# Altium PCB FMM-v1.0.PcbDoc (part 2 of 5)
Units mm, origin at the board's own origin, x right, y up, seen from the top; angles counter-clockwise.
Board outline 115 x 96 mm, 4 copper layers (Top Layer, Power Layer, Ground Layer, Bottom Layer), stack 1.57 mm thick; 218 components, 129 nets, 744 pads, 321 vias.
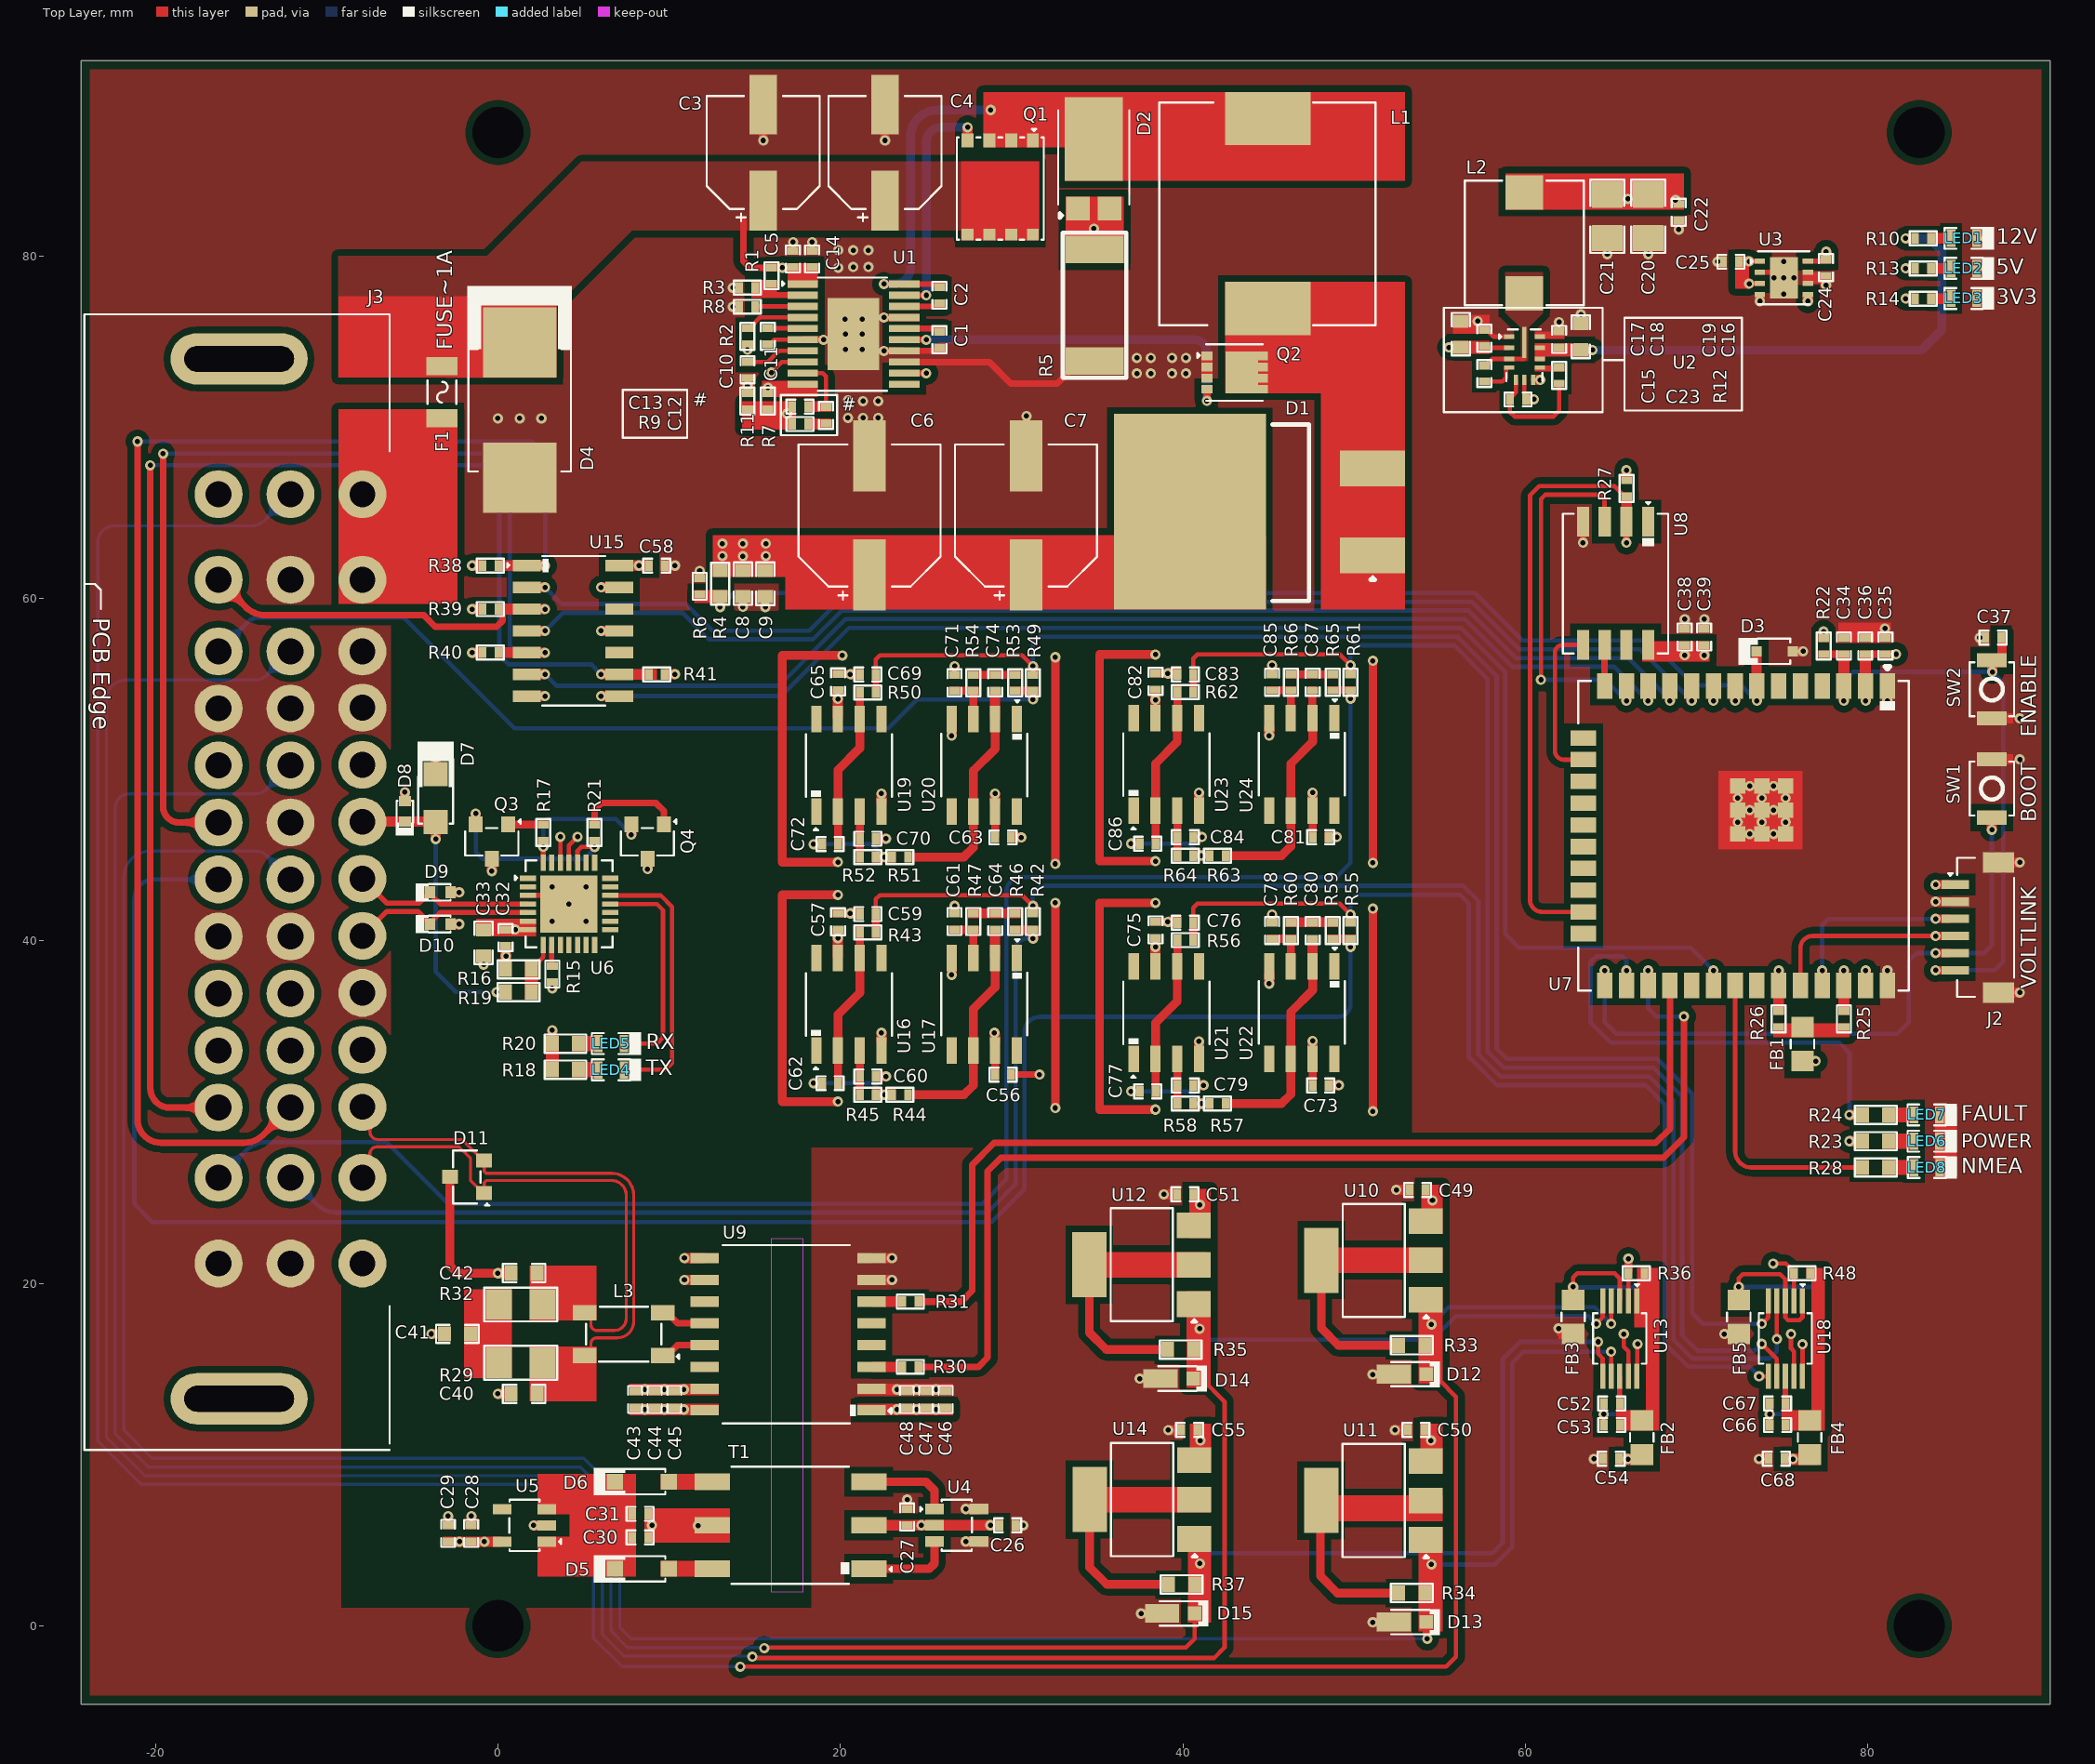
[diagram p0: Top Layer view]

## Part data (continued)
D1: "DIODE SCHOTTKY 100V 20A D2PAK", LCSC Part Number=C969989, Manufacturer=STMicroelectronics, Supplier Part Number=511-STPS20M100SG-TR, Category="Rectifier Diodes", ComponentLink1Description=https://datasheet.ciiva.com/16356/cd00228904-16356744.pdf?src-supplier=Future+Electronics, ComponentLink1URL=https://datasheet.ciiva.com/16356/cd00228904-16356744.pdf?src-supplier=Future+Electronics, ComponentLink2Description=https://datasheet.ciiva.com/917/cd00228904-917526.pdf?src-supplier=Digikey, ComponentLink2URL=https://datasheet.ciiva.com/917/cd00228904-917526.pdf?src-supplier=Digikey, ComponentLink3Description=https://datasheet.ciiva.com/917/cd00228904-917527.pdf?src-supplier=Digikey, ComponentLink3URL=https://datasheet.ciiva.com/917/cd00228904-917527.pdf?src-supplier=Digikey, Item Type=Diode, Manufacturer Part Number=STPS20M100SG-TR, Pricing="1=2.95, 10=2.48, 50=2.48, 100=2.01, 1000=1.53, 10000=1.38 (USD)", RoHS=Yes, Stock=6295, Supplier=Mouser
D2: "DIODE SCHOTTKY 60V 7A POWERDI5", LCSC Part Number=C96113, Manufacturer=Diodes, Reverse Voltage=60V, Supplier Part Number=7738990, Category="Rectifier Diodes", ComponentLink1Description=https://datasheet.ciiva.com/4715/ds30477-62081-4715698.pdf?src-supplier=Mouser, ComponentLink1URL=https://datasheet.ciiva.com/4715/ds30477-62081-4715698.pdf?src-supplier=Mouser, ComponentLink2Description=https://datasheet.ciiva.com/915/ds30477-915170.pdf?src-supplier=Digikey, ComponentLink2URL=https://datasheet.ciiva.com/915/ds30477-915170.pdf?src-supplier=Digikey, ComponentLink3Description=https://datasheet.ciiva.com/16475/ds30477-16475660.pdf?src-supplier=Future+Electronics, ComponentLink3URL=https://datasheet.ciiva.com/16475/ds30477-16475660.pdf?src-supplier=Future+Electronics, ComponentLink4Description=https://datasheet.ciiva.com/7964/ds30477-7964294.pdf?src-supplier=Element14, ComponentLink4URL=https://datasheet.ciiva.com/7964/ds30477-7964294.pdf?src-supplier=Element14, ComponentLink5Description=https://datasheet.ciiva.com/8301/ds30477-8301047.pdf?src-supplier=Avnet, ComponentLink5URL=https://datasheet.ciiva.com/8301/ds30477-8301047.pdf?src-supplier=Avnet, ComponentLink6Description=https://datasheet.ciiva.com/8301/ds30477-8301849.pdf?src-supplier=Avnet, ComponentLink6URL=https://datasheet.ciiva.com/8301/ds30477-8301849.pdf?src-supplier=Avnet, ComponentLink7Description=https://datasheet.ciiva.com/915/ds30477-915171.pdf?src-supplier=Digikey, ComponentLink7URL=https://datasheet.ciiva.com/915/ds30477-915171.pdf?src-supplier=Digikey, ComponentLink8Description=https://datasheet.ciiva.com/915/ds30477-915172.pdf?src-supplier=Digikey, ComponentLink8URL=https://datasheet.ciiva.com/915/ds30477-915172.pdf?src-supplier=Digikey, Item Type=Diode, Manufacturer Part Number=PDS760-13, Pricing="5000=0.31, 10000=0.305, 15000=0.3, 20000=0.3 (USD)", RoHS=No, Stock=295000, Supplier="Future Electronics"
D3: "DIODE ZENER 3.3V 200MW SOD323F", Forward Voltage=1V, LCSC Part Number=C2978865, Manufacturer="ON Semiconductor / Fairchild", Max Operating Temperature=150°C, Max Power Dissipation=200mW, Max Reverse Leakage Current=4.5uA, Min Operating Temperature=-65°C, Package Quantity=1, Supplier Part Number 1=MM3Z3V3BCT-ND, Test Current=5mA, Tolerance=2%, Working Voltage=3.3V, ComponentLink1Description=http://www.onsemi.com/pub/Collateral/MM3Z9V1B-D.pdf?src-supplier=Digi-Key, ComponentLink1URL=http://www.onsemi.com/pub/Collateral/MM3Z9V1B-D.pdf?src-supplier=Digi-Key, ComponentLink2Description=http://www.mouser.com/ds/2/149/MM3Z3V3B-187166.pdf?src-supplier=Mouser, ComponentLink2URL=http://www.mouser.com/ds/2/149/MM3Z3V3B-187166.pdf?src-supplier=Mouser, ComponentLink3Description=https://www.fairchildsemi.com/datasheets/MM/MM3Z9V1B.pdf?src-supplier=Avnet, ComponentLink3URL=https://www.fairchildsemi.com/datasheets/MM/MM3Z9V1B.pdf?src-supplier=Avnet, ComponentLink4Description=http://www.farnell.com/datasheets/1706525.pdf?src-supplier=Element14, ComponentLink4URL=http://www.farnell.com/datasheets/1706525.pdf?src-supplier=Element14, Element Configuration=Single, Height=1mm, Impedance=89R, Lead Free="Lead Free", Length=1.3mm, Manufacturer Part Number=MM3Z3V3B, Mount="Surface Mount", Number of Pins=2, Packaging="Tape and Reel", Peak Reverse Current=4.5uA, Power Dissipation=200mW, Pricing 1="1=0.22, 10=0.18, 100=0.0956, 500=0.06288, 1000=0.04276 (USD)", Radiation Hardening=No, REACH SVHC="No SVHC", Stock 1=473644, Supplier 1=Digi-Key, Voltage Tolerance=2%, Weight=0.0276g, Width=1.7mm, Zener Voltage=3.3V
D4: "TVS DIODE 30VWM 48.4VC SMC", Case/Package=SMC, Manufacturer=Diodes, Max Operating Temperature=175°C, Min Breakdown Voltage=33.3V, Min Operating Temperature=-55°C, Peak Pulse Current=62A, Peak Pulse Power=3kW, Power Line Protection=Yes, Reverse Standoff Voltage=30V, Supplier Part Number=3.0SMCJ30AQ-13-ND, Category="TVS Diodes", ComponentLink1Description=https://www.diodes.com/assets/product-showcases/Automotive-Grade-SMAJ-SMBJ-SMCJ-3.0SMCJ-TVS-Diodes-NPA-112018.pdf?src-supplier=Digikey, ComponentLink1URL=https://www.diodes.com/assets/product-showcases/Automotive-Grade-SMAJ-SMBJ-SMCJ-3.0SMCJ-TVS-Diodes-NPA-112018.pdf?src-supplier=Digikey, Diode Type=ZENER, Item Type=Diode, Manufacturer Part Number=3.0SMCJ30AQ-13, Mounting Technology="Surface Mount", Number of Unidirectional Channels=1, Packaging="Tape and Reel", Pricing="3000=0.66437, 6000=0.63274, 9000=0.60353 (USD)", RoHS=Yes, RoHS Compliant=Yes, Series="Automotive, AEC-Q101", Supplier=Digikey
D5 D6: "DIODE SCHOTTKY 20V 500MA SOD123", Average Rectified Current=500mA, Case/Package=SOD-123-2, Forward Voltage=385mV, LCSC Part Number=C23848, Manufacturer="ON Semiconductor", Max Forward Surge Current (Ifsm)=5.5A, Max Operating Temperature=125°C, Max Repetitive Reverse Voltage (Vrrm)=20V, Max Reverse Current=250uA, Min Operating Temperature=-65°C, Package Quantity=1, Supplier Part Number=MBR0520LT1GOSDKR-ND, Category="Schottky Diodes", ComponentLink1Description=https://datasheet.ciiva.com/915/mbr0520lt1-d-915488.pdf?src-supplier=Avnet, ComponentLink1URL=https://datasheet.ciiva.com/915/mbr0520lt1-d-915488.pdf?src-supplier=Avnet, ComponentLink2Description=https://datasheet.ciiva.com/915/mbr0520lt1-d-915488.pdf?src-supplier=Digikey, ComponentLink2URL=https://datasheet.ciiva.com/915/mbr0520lt1-d-915488.pdf?src-supplier=Digikey, ComponentLink3Description=https://datasheet.ciiva.com/14168/sy600925-e-14168052.pdf?src-supplier=Distrelec, ComponentLink3URL=https://datasheet.ciiva.com/14168/sy600925-e-14168052.pdf?src-supplier=Distrelec, ComponentLink4Description=https://datasheet.ciiva.com/5762/mbr0520lt1-d-5762891.pdf?src-supplier=Farnell, ComponentLink4URL=https://datasheet.ciiva.com/5762/mbr0520lt1-d-5762891.pdf?src-supplier=Farnell, ComponentLink5Description=https://datasheet.ciiva.com/7962/mbr0520lt1-d-7962698.pdf?src-supplier=Element14, ComponentLink5URL=https://datasheet.ciiva.com/7962/mbr0520lt1-d-7962698.pdf?src-supplier=Element14, ComponentLink6Description=https://datasheet.ciiva.com/5762/mbr0520lt1-d-5762889.pdf?src-supplier=Farnell, ComponentLink6URL=https://datasheet.ciiva.com/5762/mbr0520lt1-d-5762889.pdf?src-supplier=Farnell, ComponentLink7Description=https://datasheet.ciiva.com/14559/70099495-14559898.pdf?src-supplier=Allied+Electronics, ComponentLink7URL=https://datasheet.ciiva.com/14559/70099495-14559898.pdf?src-supplier=Allied+Electronics, ComponentLink8Description=https://datasheet.ciiva.com/4714/mbr0520lt1-d-94265-4714156.pdf?src-supplier=Mouser, ComponentLink8URL=https://datasheet.ciiva.com/4714/mbr0520lt1-d-94265-4714156.pdf?src-supplier=Mouser, ComponentLink9Description=https://datasheet.ciiva.com/7961/mbr0520lt1-d-7961765.pdf?src-supplier=Element14, ComponentLink9URL=https://datasheet.ciiva.com/7961/mbr0520lt1-d-7961765.pdf?src-supplier=Element14, ComponentLink10Description=https://datasheet.ciiva.com/7962/mbr0520lt1-d-7962699.pdf?src-supplier=Element14, ComponentLink10URL=https://datasheet.ciiva.com/7962/mbr0520lt1-d-7962699.pdf?src-supplier=Element14, ComponentLink11Description=https://datasheet.ciiva.com/16395/mbr0520lt1-d-16395977.pdf?src-supplier=Future+Electronics, ComponentLink11URL=https://datasheet.ciiva.com/16395/mbr0520lt1-d-16395977.pdf?src-supplier=Future+Electronics, ComponentLink12Description=https://datasheet.ciiva.com/915/mbr0520lt1-d-915489.pdf?src-supplier=Digikey, ComponentLink12URL=https://datasheet.ciiva.com/915/mbr0520lt1-d-915489.pdf?src-supplier=Digikey, ComponentLink13Description=https://datasheet.ciiva.com/915/mbr0520lt1-d-915490.pdf?src-supplier=Digikey, ComponentLink13URL=https://datasheet.ciiva.com/915/mbr0520lt1-d-915490.pdf?src-supplier=Digikey, Current Rating=500mA, Element Configuration=Single, Forward Current=500mA, Height=1.12mm, Item Type=Diode, Lead Free="Lead Free", Length=2.69mm, Manufacturer Part Number=MBR0520LT1G, Max Reverse Leakage Current=250uA, Max Reverse Voltage (DC)=20V, Max Surge Current=5.5A, Output Current=500mA, Packaging="Tape and Reel", Peak Non-Repetitive Surge Current=5.5A, Pins=2, Polarity=Standard, Pricing="1=0.36, 10=0.255, 100=0.129, 500=0.1052, 1000=0.07805 (USD)", Radiation Hardening=No, Reach SVHC Compliant=No, RoHS=Yes, RoHS Compliant=Yes, Series=-, Supplier=Digikey, Termination=SMD/SMT, Voltage Rating (DC)=20V, Width=1.6mm
D7: "DIODE SCHOTTKY 30V 1A SOD123W", LCSC Part Number=C456106, Manufacturer=Nexperia, Supplier Part Number 1=1727-5201-1-ND, Manufacturer Part Number=PMEG3010ER,115, Pricing 1="1=0.35, 10=0.282, 25=0.258, 100=0.162, 250=0.1602, 500=0.15, 1000=0.102 (USD)", Stock 1=72983, Supplier 1=Digi-Key
D8 D9 D10: "SOD-523 ESD Protection Devices ROHS", LCSC Part Number=C5199850, Manufacturer=UMW, Package=SOD-523, ComponentLink1Description=LCSC, ComponentLink1URL=https://www.lcsc.com/product-detail/span-style-background-color-ff0-ESD-span-Protection-Devices_UMW-Youtai-Semiconductor-Co-Ltd-LESD5D5-0CT1G_C5199850.html, Item Type="Protection Device", Manufacturer Part Number=LESD5D5.0CT1G
D11: "TVS DIODE 7V/12V 14V/26V SOT23-3", Breakdown Voltage=13.3V, Case/Package=SOT-23, Clamping Voltage=19V, LCSC Part Number=C404012, Leakage Current=20uA, Manufacturer=Bourns, Max Operating Temperature=150°C, Max Power Dissipation=600W, Max Surge Current=30A, Min Breakdown Voltage=7.5V, Min Operating Temperature=-55°C, Peak Pulse Current=17A, Peak Pulse Power=400W, Power Line Protection=No, Reverse Standoff Voltage=12V, Supplier Part Number=7673728P, Test Current=1mA, Category="TVS Diodes", ComponentLink1Description=https://datasheet.ciiva.com/1281/1670933-1281331.pdf?src-supplier=Farnell, ComponentLink1URL=https://datasheet.ciiva.com/1281/1670933-1281331.pdf?src-supplier=Farnell, ComponentLink2Description=https://datasheet.ciiva.com/4510/cdsot23-sm712-25932-4510261.pdf?src-supplier=Mouser, ComponentLink2URL=https://datasheet.ciiva.com/4510/cdsot23-sm712-25932-4510261.pdf?src-supplier=Mouser, ComponentLink3Description=https://datasheet.ciiva.com/11193/cdsot23-sm712-11193846.pdf?src-supplier=Avnet, ComponentLink3URL=https://datasheet.ciiva.com/11193/cdsot23-sm712-11193846.pdf?src-supplier=Avnet, ComponentLink4Description=https://datasheet.ciiva.com/22696/1670933-22696779.pdf?src-supplier=Element14, ComponentLink4URL=https://datasheet.ciiva.com/22696/1670933-22696779.pdf?src-supplier=Element14, ComponentLink5Description=https://datasheet.ciiva.com/26828/getdatasheetpartid-418501-26828522.pdf?src-supplier=Verical, ComponentLink5URL=https://datasheet.ciiva.com/26828/getdatasheetpartid-418501-26828522.pdf?src-supplier=Verical, ComponentLink6Description=https://datasheet.ciiva.com/337/cdsot23-sm712-337451.pdf?src-supplier=Digikey, ComponentLink6URL=https://datasheet.ciiva.com/337/cdsot23-sm712-337451.pdf?src-supplier=Digikey, ComponentLink7Description=https://datasheet.ciiva.com/337/cdsot23-sm712-337452.pdf?src-supplier=Digikey, ComponentLink7URL=https://datasheet.ciiva.com/337/cdsot23-sm712-337452.pdf?src-supplier=Digikey, Contact Plating=Tin, Depth=1.4mm, Diode Type=ZENER, Direction=Bidirectional, ESD Protection=Yes, Height=1.11mm, Item Type="Surge Protection (TVS/ESD)", Length=3.04mm, Manufacturer Part Number=CDSOT23-SM712, Max Breakdown Voltage=13.3V, Max Reverse Leakage Current=20uA, Mounting Technology="Surface Mount", Number of Bidirectional Channels=2, Number of Channels=2, Number of Elements=2, Packaging="Tape and Reel", Pins=3, Polarity=Bidirectional,Unidirectional, Power Dissipation=400W, Pricing="100=0.935, 1500=0.651, 3000=0.565, 6000=0.553 (GBP)", Radiation Hardening=No, Reach SVHC Compliant=No, Reverse Breakdown Voltage=13.3V, RoHS=Yes, RoHS Compliant=Yes, Series=-, Stock=89660, Supplier=Rs, Termination=SMD/SMT, Width=0.055inch, Working Voltage=12V
D12 D13 D14 D15: "TVS DIODE 3.3VWM 11.5VC MICROSMP", Breakdown Voltage=4.1V, Clamping Voltage=11V, LCSC Part Number=C241899, Max Operating Temperature=150°C, Max Reverse Leakage Current=200uA, Max Surge Current=75A, Min Operating Temperature=-55°C, Operating Supply Voltage=3.3V, Package Quantity=4500, Peak Pulse Current=87A, Peak Pulse Power=150W, Power Line Protection=No, Supplier Part Number=625-MSP3V3HM3, Test Current=1mA, Category="TVS Diodes", ComponentLink1Description=LCSC, ComponentLink2Description=https://datasheet.ciiva.com/14080/msp3v3-14080471.pdf?src-supplier=Digi-Key, ComponentLink2URL=https://datasheet.ciiva.com/14080/msp3v3-14080471.pdf?src-supplier=Digi-Key, Diode Type=ZENER, Direction=Unidirectional, Item Type="TVS Diode", Min Breakdown Voltage=4.1V, Mounting Technology="Surface Mount", Number of Unidirectional Channels=1, Packaging="Tape and Reel", Polarity=Unidirectional, Pricing="1=0.39, 10=0.313, 50=0.313, 100=0.165, 1000=0.068, 10000=0.05 (USD)", Reverse Standoff Voltage=3.3V, RoHS=Yes, RoHS Compliant=Yes, Series="Automotive, AEC-Q101, TransZorb®, eSMP™", Stock=15021, Supplier=Mouser
F1: "16V 1A 100A 1.8A 1206 Resettable Fuses ROHS", LCSC Part Number=C883131, Manufacturer=BHFUSE, Manufacturer Part Number=BSMD1206-100-16V, RoHS=No, Supplier=LCSC
FB1 FB2 FB3 FB4 FB5: "FERRITE BEAD 1K OHM 0805 1LN", Case Code (Imperial)=0805, Case Code (Metric)=2012, DC Resistance (DCR)=300mR, LCSC Part Number=C307765, Manufacturer=TDK, Max Current Rating=500mA, Max Operating Temperature=125°C, Min Operating Temperature=-55°C, Package Quantity=4000, Ratings=AEC-Q200, Supplier Part Number 1=445-MMZ2012R102ATD25CT-ND, Test Frequency=100MHz, Tolerance=25%, Case/Package=0805, Category="Ferrite Beads and Chips", ComponentLink1Description=http://www.mouser.com/ds/2/400/beads_automotive_signal_mmz_en-469244.pdf?src-supplier=Mouser, ComponentLink1URL=http://www.mouser.com/ds/2/400/beads_automotive_signal_mmz_en-469244.pdf?src-supplier=Mouser, ComponentLink2Description=https://product.tdk.com/info/en/catalog/datasheets/beads_automotive_signal_mmz2012_en.pdf?src-supplier=Digi-Key, ComponentLink2URL=https://product.tdk.com/info/en/catalog/datasheets/beads_automotive_signal_mmz2012_en.pdf?src-supplier=Digi-Key, Height=0.041inch, Impedance=1kR, Item Type="Ferrite Bead", Length=0.079inch, Manufacturer Part Number=MMZ2012R102ATD25, Max DC Current=500mA, Mount="Surface Mount", Number of Lines=1, Packaging="Tape and Reel", Pricing 1="1=0.11000, 10=0.09200, 25=0.08280, 50=0.06080, 100=0.05240, 250=0.04140, 500=0.03496, 1000=0.02944 (USD)", RoHS=Yes, RoHS Compliant=Yes, Stock 1=2942, Supplier 1=Digi-Key, Termination=SMD/SMT, Weight=0.000194oz, Width=0.049inch
J2: library part C145963, "1x6P SH 1 1mm 6 SMD,P=1mm Wire To Board / Wire To Wire Connector ROHS", Manufacturer=BOOMELE, Package=SMD,P=1mm, ComponentLink1Description=LCSC, ComponentLink1URL=https://www.lcsc.com/product-detail/Wire-To-Board-Wire-To-Wire-Connector_BOOMELE-Boom-Precision-Elec-C145963_C145963.html, Item Type=Connector, LCSC Part Number=C145963, Manufacturer Part Number=C145963
L1: library part SRP1265A-8R2M, "FIXED IND 8.2UH 10.5A 15.5 MOHM", Case/Package=Nonstandard, Current Rating=10.5A, DC Resistance (DCR)=15.5mR, Inductance Tolerance=20%, LCSC Part Number=C2042528, Manufacturer=Bourns, Max Operating Temperature=150°C, Min Operating Temperature=-40°C, Ratings=AEC-Q200, Saturation Current=16A, Self Resonant Frequency=11MHz, Supplier Part Number=64X8728, Test Frequency=100kHz, Category="Fixed Inductors", ComponentLink1Description=https://datasheet.ciiva.com/48685/srp1265a-48685302.pdf?src-supplier=Avnet, ComponentLink1URL=https://datasheet.ciiva.com/48685/srp1265a-48685302.pdf?src-supplier=Avnet, Core Material="Carbonyl Powder", Depth=12.5mm, Height=6.2mm, Height - Seated (Max)=0.252inch, Item Type=Inductor, Length=0.531inch, Manufacturer Part Number=SRP1265A-8R2M, Max DC Current=10.5A, Mounting Technology="Surface Mount", Packaging="Cut Tape", Pricing="1=0.97 (USD)", Radiation Hardening=No, Reach SVHC Compliant=No, RMS Current (Irms)=10.5A, RoHS=Yes, RoHS Compliant=Yes, Series=SRP1265A, Shielding=Shielded, Stock=27, Supplier=Avnet, Termination=SMD/SMT, Tolerance=20%, Width=0.492inch
L2: library part CLF7045T-2R2N-D, "FIXED IND 2.2UH 4.3A 18.98 MOHM", LCSC Part Number=C474321, Manufacturer=TDK, Category="Fixed Inductors", ComponentLink1Description=https://datasheet.ciiva.com/30489/0900766b8129d3e9-30489231.pdf?src-supplier=Rs, ComponentLink1URL=https://datasheet.ciiva.com/30489/0900766b8129d3e9-30489231.pdf?src-supplier=Rs, ComponentLink2Description=https://datasheet.ciiva.com/15026/e531-clf-d-15026965.pdf?src-supplier=Digikey, ComponentLink2URL=https://datasheet.ciiva.com/15026/e531-clf-d-15026965.pdf?src-supplier=Digikey, ComponentLink3Description=https://datasheet.ciiva.com/15026/e531-clf-d-15026966.pdf?src-supplier=Digikey, ComponentLink3URL=https://datasheet.ciiva.com/15026/e531-clf-d-15026966.pdf?src-supplier=Digikey, ComponentLink4Description=https://datasheet.ciiva.com/15026/e531-clf-d-15026967.pdf?src-supplier=Digikey, ComponentLink4URL=https://datasheet.ciiva.com/15026/e531-clf-d-15026967.pdf?src-supplier=Digikey, Item Type=Inductor, Manufacturer Part Number=CLF7045T-2R2N-D, Pricing="1=0.5089, 10=0.502, 25=0.4797, 100=0.467, 250=0.4651, 500=0.4631, 1000=0.4612 (USD)", RoHS=Yes, Stock=1021, Supplier="Arrow Electronics", Supplier Part Number=CLF7045T-2R2N-D
L3: "CMC 51UH 200MA 2LN 2.8KOHM SMD", Case Code (Imperial)=1812, Current Rating=200mA, DC Resistance (DCR)=1R, Insulation Resistance=10MR, LCSC Part Number=C76584, Manufacturer=TDK, Max Operating Temperature=150°C, Min Operating Temperature=-40°C, Package Quantity=2000, Ratings=AEC-Q200, Test Frequency=10MHz, Tolerance=50%, Voltage Rating=50V, Case/Package=1812, Category="Fixed Inductors", ComponentLink1Description=https://datasheet.ciiva.com/22726/1649098-22726290.pdf?src-supplier=Element14, ComponentLink1URL=https://datasheet.ciiva.com/22726/1649098-22726290.pdf?src-supplier=Element14, ComponentLink2Description=https://datasheet.ciiva.com/1007/e9711-act-1007931.pdf?src-supplier=Digikey, ComponentLink2URL=https://datasheet.ciiva.com/1007/e9711-act-1007931.pdf?src-supplier=Digikey, ComponentLink3Description=https://datasheet.ciiva.com/1007/e9711-act-1007933.pdf?src-supplier=Digikey, ComponentLink3URL=https://datasheet.ciiva.com/1007/e9711-act-1007933.pdf?src-supplier=Digikey, ComponentLink4Description=https://datasheet.ciiva.com/8498/e9711-act-8498633.pdf?src-supplier=Avnet, ComponentLink4URL=https://datasheet.ciiva.com/8498/e9711-act-8498633.pdf?src-supplier=Avnet, ComponentLink5Description=https://datasheet.ciiva.com/7649/1833202-7649183.pdf?src-supplier=Element14, ComponentLink5URL=https://datasheet.ciiva.com/7649/1833202-7649183.pdf?src-supplier=Element14, ComponentLink6Description=https://datasheet.ciiva.com/1007/e9711-act-1007932.pdf?src-supplier=Digikey, ComponentLink6URL=https://datasheet.ciiva.com/1007/e9711-act-1007932.pdf?src-supplier=Digikey, ComponentLink7Description=https://datasheet.ciiva.com/15191/getdatasheetpartid-349822-15191803.pdf?src-supplier=Verical, ComponentLink7URL=https://datasheet.ciiva.com/15191/getdatasheetpartid-349822-15191803.pdf?src-supplier=Verical, DC Current=200mA, DC Resistance-Max=1R, Depth=3.4mm, Height=3mm, Impedance=2.8kR, Item Type="Common Mode Filter", Lead Free=5697LeadFree, Length=4.5mm, Manufacturer Part Number=ACT45B-510-2P-TL003, Max Current Rating=200mA, Max DC Current=200mA, Military Standard=Not, Mounting Technology="Surface Mount", Number of Lines=2, Packaging="Tape and Reel", Pins=4, Pricing="2500=0.8915, 5000=0.8612, 10000=0.8526 (USD)", Radiation Hardening=No, Reach SVHC Compliant=No, RoHS=Yes, RoHS Compliant=Yes, Series=ACT, Stock=390000, Supplier="Arrow Electronics", Supplier Part Number=ACT45B-510-2P-TL003, Termination=SMD/SMT, Voltage Rating (DC)=50V, Width=3.2mm
LED1 LED2 LED3 LED7: library part NCD0603R3, "RED LED 0603 Light Emitting Diodes", LCSC Part Number=C3151730, Manufacturer="Foshan NationStar Optoelectronics", Package=0603, ComponentLink1Description=LCSC, ComponentLink1URL=https://www.lcsc.com/product-detail/Light-Emitting-Diodes-LED_Foshan-NationStar-Optoelectronics-NCD0603R3_C3151730.html, Item Type=LED, Manufacturer Part Number=NCD0603R3
LED4 LED5: library part NCD0603Y2, "yellow 0603 Light Emitting Diodes (LED) ROHS", LCSC Part Number=C89811, Manufacturer="Foshan NationStar Optoelectronics", Package=0603, ComponentLink1Description=LCSC, ComponentLink1URL=https://www.lcsc.com/product-detail/Light-Emitting-Diodes-LED_Foshan-NationStar-Optoelectronics-NCD0603Y2_C89811.html, Item Type=LED, Manufacturer Part Number=NCD0603Y2
LED6: library part NCD0603G2, "Emerald 0603 Light Emitting Diodes (LED) ROHS", LCSC Part Number=C87326, Manufacturer="Foshan NationStar Optoelectronics", Package=0603, ComponentLink1Description=LCSC, ComponentLink1URL=https://www.lcsc.com/product-detail/Light-Emitting-Diodes-LED_Foshan-NationStar-Optoelectronics-NCD0603G2_C87326.html, Item Type=LED, Manufacturer Part Number=NCD0603G2
LED8: library part NCD0603B3, "blue 0603 Light Emitting Diodes (LED) ROHS", LCSC Part Number=C158101, Manufacturer="Foshan NationStar Optoelectronics", Package=0603, ComponentLink1Description=LCSC, ComponentLink1URL=https://www.lcsc.com/product-detail/Light-Emitting-Diodes-LED_Foshan-NationStar-Optoelectronics-NCD0603B3_C158101.html, Item Type=LED, Manufacturer Part Number=NCD0603B3
Q1: "MOSFET N-CH 40V 15A/50A 8VSON", LCSC Part Number=C78118, Manufacturer="Texas Instruments", Supplier Part Number=595-CSD18504Q5A, Category=MOSFETs, ComponentLink1Description=https://datasheet.ciiva.com/13063/csd18504q5a-123974-13063385.pdf?src-supplier=Mouser, ComponentLink1URL=https://datasheet.ciiva.com/13063/csd18504q5a-123974-13063385.pdf?src-supplier=Mouser, ComponentLink2Description=https://datasheet.ciiva.com/14192/csd18504q5a-14192913.pdf?src-supplier=Avnet, ComponentLink2URL=https://datasheet.ciiva.com/14192/csd18504q5a-14192913.pdf?src-supplier=Avnet, ComponentLink3Description=https://datasheet.ciiva.com/6386/csd18504q5a-6386886.pdf?src-supplier=Digikey, ComponentLink3URL=https://datasheet.ciiva.com/6386/csd18504q5a-6386886.pdf?src-supplier=Digikey, ComponentLink4Description=https://datasheet.ciiva.com/6386/csd18504q5a-6386887.pdf?src-supplier=Digikey, ComponentLink4URL=https://datasheet.ciiva.com/6386/csd18504q5a-6386887.pdf?src-supplier=Digikey, ComponentLink5Description=https://datasheet.ciiva.com/6386/csd18504q5a-6386888.pdf?src-supplier=Digikey, ComponentLink5URL=https://datasheet.ciiva.com/6386/csd18504q5a-6386888.pdf?src-supplier=Digikey, Item Type=MOSFET, Manufacturer Part Number=CSD18504Q5A, Pricing="1=1.09, 10=0.894, 50=0.894, 100=0.696, 1000=0.481, 10000=0.41 (USD)", RoHS=Yes, Stock=58587, Supplier=Mouser
Q2: "MOSFET N-CH 30V 20A/60A 8VSON", LCSC Part Number=C485528, Manufacturer="Texas Instruments", Supplier Part Number=595-CSD17309Q3, Category=MOSFETs, ComponentLink1Description=https://datasheet.ciiva.com/6381/csd17309q3-6381394.pdf?src-supplier=Digikey, ComponentLink1URL=https://datasheet.ciiva.com/6381/csd17309q3-6381394.pdf?src-supplier=Digikey, ComponentLink2Description=https://datasheet.ciiva.com/4438/slps261a-122188-4438334.pdf?src-supplier=Mouser, ComponentLink2URL=https://datasheet.ciiva.com/4438/slps261a-122188-4438334.pdf?src-supplier=Mouser, ComponentLink3Description=https://datasheet.ciiva.com/1255/csd17309q3-1255355.pdf?src-supplier=Newark, ComponentLink3URL=https://datasheet.ciiva.com/1255/csd17309q3-1255355.pdf?src-supplier=Newark, ComponentLink4Description=https://datasheet.ciiva.com/7968/1276211-7968248.pdf?src-supplier=Element14, ComponentLink4URL=https://datasheet.ciiva.com/7968/1276211-7968248.pdf?src-supplier=Element14, ComponentLink5Description=https://datasheet.ciiva.com/6381/csd17309q3-6381350.pdf?src-supplier=Digikey, ComponentLink5URL=https://datasheet.ciiva.com/6381/csd17309q3-6381350.pdf?src-supplier=Digikey, Item Type=Mosfet, Manufacturer Part Number=CSD17309Q3, Pricing="1=0.95, 10=0.824, 50=0.824, 100=0.661, 1000=0.48, 10000=0.411 (USD)", RoHS=Yes, Stock=6648, Supplier=Mouser
Q3 Q4: "25V 300mW 120@100mA,1V 1.5A NPN SOT-23 Bipolar Transistors - BJT ROHS", LCSC Part Number=C164886, Manufacturer="Jiangsu Changjing Electronics Technology", Package=SOT-23, ComponentLink1Description=LCSC, ComponentLink1URL=https://www.lcsc.com/product-detail/Bipolar-Transistors-BJT_Jiangsu-Changjing-Electronics-Technology-Co-Ltd-SS8050-G_C164886.html, Itype Type=Transistor, Manufacturer Part Number=SS8050-G
R1: library part RT0402BRD0734K8L, "RES SMD 34.8KOHM 0.1% 1/16W 0402", Case Code (Imperial)=0402, Case Code (Metric)=1005, LCSC Part Number=C852732, Manufacturer=Yageo, Max Operating Temperature=125°C, Min Operating Temperature=-55°C, Power Rating=62.5mW, Supplier Part Number=603-RT0402BRD0734K8L, Temperature Coefficient=25ppm/°C, Tolerance=0.1%, Voltage Rating=50V, Case/Package=0402, Category="Chip SMD Resistors", ComponentLink1Description=https://datasheet.ciiva.com/12721/pyu-rt-1-to-0-05-rohs-l-4-12721932.pdf?src-supplier=Mouser, ComponentLink1URL=https://datasheet.ciiva.com/12721/pyu-rt-1-to-0-05-rohs-l-4-12721932.pdf?src-supplier=Mouser, Height=350um, Item Type=Resistor, Lead Free="Lead Free", Length=1mm, Manufacturer Part Number=RT0402BRD0734K8L, Packaging="Tape and Reel", Pricing="1=0.38, 10=0.296, 50=0.296, 100=0.08, 1000=0.052, 10000=0.041 (USD)", RoHS=Yes, RoHS Compliant=Yes, Series=RT, Stock=12259, Supplier=Mouser, Termination=SMD/SMT, Voltage Rating (DC)=50V, Width=500um
R2: library part RC0402FR-071ML, "RES 1M OHM 1% 1/16W 0402", Case Code (Imperial)=0402, Case Code (Metric)=1005, LCSC Part Number=C138033, Manufacturer=Yageo, Max Operating Temperature=155°C, Max Power Dissipation=63mW, Min Operating Temperature=-55°C, Resistance Tolerance=1%, Resistor Type="Thick Film", Supplier Part Number=311-1.00MLRCT-ND, Temperature Coefficient=100ppm/°C, Voltage Rating=50V, Case/Package=0402, Category="Chip SMD Resistors", ComponentLink1Description=https://datasheet.ciiva.com/11808/0900766b80c66297-11808125.pdf?src-supplier=Rs, ComponentLink1URL=https://datasheet.ciiva.com/11808/0900766b80c66297-11808125.pdf?src-supplier=Rs, ComponentLink2Description=https://datasheet.ciiva.com/46394/1018594-46394951.pdf?src-supplier=Element14, ComponentLink2URL=https://datasheet.ciiva.com/46394/1018594-46394951.pdf?src-supplier=Element14, ComponentLink3Description=https://datasheet.ciiva.com/7849/1018594-7849883.pdf?src-supplier=Element14, ComponentLink3URL=https://datasheet.ciiva.com/7849/1018594-7849883.pdf?src-supplier=Element14, ComponentLink4Description=https://datasheet.ciiva.com/7849/1018594-7849882.pdf?src-supplier=Element14, ComponentLink4URL=https://datasheet.ciiva.com/7849/1018594-7849882.pdf?src-supplier=Element14, ComponentLink5Description=https://datasheet.ciiva.com/16741/pyu-rc0402-51-rohs-l-6-r-16741081.pdf?src-supplier=Future+Electronics, ComponentLink5URL=https://datasheet.ciiva.com/16741/pyu-rc0402-51-rohs-l-6-r-16741081.pdf?src-supplier=Future+Electronics, Construction=Rectangular, Depth=0.5mm, Features="Moisture Resistant", Height=0.32mm, Item Type=Resistor, Lead Free=5697LeadFree, Length=1mm, Manufacturer Part Number=RC0402FR-071ML, Military Standard=Not, Number of Terminations=2, Packaging="Tape and Reel", Power Rating=63mW, Pricing="1=0.1, 10=0.015, 50=0.0088, 100=0.0073, 500=0.00488, 1000=0.00417, 5000=0.00297 (USD)", Reach SVHC Compliant=Unknown, RoHS=Yes, RoHS Compliant=Yes, Series=RC, Stock=6516, Supplier=Digikey, Technology="THICK FILM", Termination=SMD/SMT, Tolerance=1%, Voltage Rating (AC)=50V
R3: library part RT0402BRD0712K1L, "RES SMD 12.1KOHM 0.1% 1/16W 0402", LCSC Part Number=C281773, Manufacturer=Yageo, Supplier Part Number=2068365, Category="Chip SMD Resistors", ComponentLink1Description=https://datasheet.ciiva.com/12812/pyu-rt-1-to-0-05-rohs-l-4-12812462.pdf?src-supplier=Mouser, ComponentLink1URL=https://datasheet.ciiva.com/12812/pyu-rt-1-to-0-05-rohs-l-4-12812462.pdf?src-supplier=Mouser, Item Type=Resistor, Manufacturer Part Number=RT0402BRD0712K1L, Pricing="10000=0.0245, 20000=0.0217, 30000=0.0237, 50000=0.0233, 100000=0.0228, 200000=0.022 (USD)", RoHS=Yes, Stock=60000, Supplier="Future Electronics"
R4: library part RT0603BRD0747KL, "RES SMD 47K OHM 0.1% 1/10W 0603", Case Code (Imperial)=0603, Case Code (Metric)=1608, LCSC Part Number=C326725, Manufacturer=Yageo, Max Operating Temperature=125°C, Max Power Dissipation=100mW, Min Operating Temperature=-55°C, Package Quantity=5000, Resistance=47kR, Resistor Type="Thin Film", Temperature Coefficient=25ppm/°C, Voltage Rating=75V, Voltage Rating (DC)=50V, Case/Package=0603, Category="Chip SMD Resistors", ComponentLink1Description=https://datasheet.ciiva.com/2585/pyu-rt-1-to-0-05-rohs-l-4-2585964.pdf?src-supplier=Digi-Key, ComponentLink1URL=https://datasheet.ciiva.com/2585/pyu-rt-1-to-0-05-rohs-l-4-2585964.pdf?src-supplier=Digi-Key, ComponentLink2Description=https://datasheet.ciiva.com/46635/pyu-rt-1-to-0-05-rohs-l-5-46635309.pdf?src-supplier=Digi-Key, ComponentLink2URL=https://datasheet.ciiva.com/46635/pyu-rt-1-to-0-05-rohs-l-5-46635309.pdf?src-supplier=Digi-Key, Construction=Rectangular, Contact Plating=Tin,Lead, Depth=0.8mm, Features="Moisture Resistant", Height=0.022inch, Item Type=Resistor, Lead Free="Lead Free", Length=0.063inch, Manufacturer Part Number=RT0603BRD0747KL, Military Standard=Not, Number of Terminations=2, Packaging="Tape and Reel", Power Rating=100mW, Pricing 1="1=0.29190, 10=0.22910, 25=0.22680, 100=0.09530, 250=0.09440, 500=0.09340, 1000=0.04780, 3000=0.03070 (USD)", RoHS=Yes, RoHS Compliant=Yes, Series=RT, Stock 1=5153, Supplier 1="Arrow Electronics", Supplier Part Number 1=RT0603BRD0747KL, Termination=SMD/SMT, Width=0.031inch
R5: library part CRA2512-FZ-R010ELF, "RES 0.01 OHM 1% 3W 2512", Case Code (Imperial)=2512, Case Code (Metric)=6432, Case/Package=348Case, LCSC Part Number=C840621, Manufacturer=Bourns, Max Operating Temperature=170°C, Min Operating Temperature=-55°C, Power Rating=3W, Resistance Tolerance=1%, Resistor Type="Metal Film", Supplier Part Number=6934381P, Temperature Coefficient=75ppm/°C, Category="Chip SMD Resistors", ComponentLink1Description=http://www.farnell.com/datasheets/2253366.pdf?src-supplier=Farnell, ComponentLink1URL=http://www.farnell.com/datasheets/2253366.pdf?src-supplier=Farnell, ComponentLink2Description=https://www.bourns.com/docs/product-datasheets/cra.pdf?src-supplier=Digikey, ComponentLink2URL=https://www.bourns.com/docs/product-datasheets/cra.pdf?src-supplier=Digikey, ComponentLink3Description=https://datasheet.octopart.com/CRA2512-FZ-R010ELF-Bourns-datasheet-15983344.pdf?src-supplier=Element14, ComponentLink3URL=https://datasheet.octopart.com/CRA2512-FZ-R010ELF-Bourns-datasheet-15983344.pdf?src-supplier=Element14, ComponentLink4Description=http://www.farnell.com/datasheets/1849485.pdf?src-supplier=Newark, ComponentLink4URL=http://www.farnell.com/datasheets/1849485.pdf?src-supplier=Newark, ComponentLink5Description=https://datasheet.octopart.com/CRA2512-FZ-R010ELF-Bourns-datasheet-68301994.pdf?src-supplier=Newark, ComponentLink5URL=https://datasheet.octopart.com/CRA2512-FZ-R010ELF-Bourns-datasheet-68301994.pdf?src-supplier=Newark, ComponentLink6Description=http://www.farnell.com/datasheets/2253366.pdf?src-supplier=Newark, ComponentLink6URL=http://www.farnell.com/datasheets/2253366.pdf?src-supplier=Newark, Height=900um, Item Type=Resistor, Manufacturer Part Number=CRA2512-FZ-R010ELF, Packaging=13Packaging, Pins=2NUMBER, Pricing="50=0.49, 100=0.46, 250=0.428, 500=0.39 (GBP)", RoHS=No, Stock=15000, Supplier=Rs, Tolerance=1%, Width=3.2mm
R6: library part RT0402BRD071K6L, "RES SMD 1.6K OHM 0.1% 1/16W 0402", Case Code (Imperial)=0402, Case Code (Metric)=1005, LCSC Part Number=C852616, Manufacturer=Yageo, Max Operating Temperature=125°C, Max Power Dissipation=63mW, Min Operating Temperature=-55°C, Package Quantity=10000, Power Rating=62.5mW, Resistance=1.6kR, Resistor Type="Thin Film", Supplier Part Number 1=YAG4199CT-ND, Temperature Coefficient=25ppm/°C, Tolerance=0.1%, Voltage Rating=50V, Case/Package=0402, Category="Chip SMD Resistors", ComponentLink1Description=https://datasheet.ciiva.com/2582/pyu-rt-1-to-0-05-rohs-l-5-2582211.pdf?src-supplier=Digi-Key, ComponentLink1URL=https://datasheet.ciiva.com/2582/pyu-rt-1-to-0-05-rohs-l-5-2582211.pdf?src-supplier=Digi-Key, Height=0.014inch, Item Type=Resistor, Lead Free="Lead Free", Length=0.039inch, Manufacturer Part Number=RT0402BRD071K6L, Number of Terminations=2, Packaging="Tape and Reel", Pricing 1="1=0.40000, 10=0.33600, 100=0.13130, 500=0.07938, 1000=0.05496, 2500=0.05038, 5000=0.04580 (USD)", RoHS=Yes, RoHS Compliant=Yes, Series=RT, Stock 1=20555, Supplier 1=Digi-Key, Termination=SMD/SMT, Voltage Rating (DC)=50V, Weight=2.3E-05oz, Width=0.5mm
R7: library part RT0402BRD078K66L, "RES SMD 8.66KOHM 0.1% 1/16W 0402", LCSC Part Number=C852945, Manufacturer=Yageo, Supplier Part Number=603-RT0402BRD078K66L, Category="Chip SMD Resistors", ComponentLink1Description=https://datasheet.ciiva.com/12721/pyu-rt-1-to-0-05-rohs-l-4-12721182.pdf?src-supplier=Mouser, ComponentLink1URL=https://datasheet.ciiva.com/12721/pyu-rt-1-to-0-05-rohs-l-4-12721182.pdf?src-supplier=Mouser, ComponentLink2Description=https://datasheet.ciiva.com/2582/pyu-rt-1-to-0-05-rohs-l-5-2582522.pdf?src-supplier=Digikey, ComponentLink2URL=https://datasheet.ciiva.com/2582/pyu-rt-1-to-0-05-rohs-l-5-2582522.pdf?src-supplier=Digikey, Item Type=Resistor, Manufacturer Part Number=RT0402BRD078K66L, Pricing="1=0.38, 10=0.171, 50=0.171, 100=0.077, 1000=0.052, 10000=0.041 (USD)", RoHS=Yes, Stock=7615, Supplier=Mouser
R8: library part RT0402BRD0721KL, "RES SMD 21K OHM 0.1% 1/16W 0402", Case Code (Imperial)=0402, Case Code (Metric)=1005, LCSC Part Number=C852638, Manufacturer=Yageo, Max Operating Temperature=155°C, Max Power Dissipation=63mW, Min Operating Temperature=-55°C, Package Quantity=10000, Power Rating=62.5mW, Supplier Part Number=8165118, Temperature Coefficient=25ppm/°C, Tolerance=0.1%, Voltage Rating=50V, Case/Package=0402, Category="Chip SMD Resistors", ComponentLink1Description=https://datasheet.ciiva.com/2582/pyu-rt-1-to-0-05-rohs-l-4-2582229.pdf?src-supplier=Digikey, ComponentLink1URL=https://datasheet.ciiva.com/2582/pyu-rt-1-to-0-05-rohs-l-4-2582229.pdf?src-supplier=Digikey, ComponentLink2Description=https://datasheet.ciiva.com/46635/pyu-rt-1-to-0-05-rohs-l-5-46635166.pdf?src-supplier=Digikey, ComponentLink2URL=https://datasheet.ciiva.com/46635/pyu-rt-1-to-0-05-rohs-l-5-46635166.pdf?src-supplier=Digikey, Features="Moisture Resistant", Height=0.014inch, Item Type=Resistor, Lead Free="Lead Free", Length=0.039inch, Manufacturer Part Number=RT0402BRD0721KL, Number of Terminations=2, Packaging="Tape and Reel", Pricing="10000=0.0236, 20000=0.0231, 40000=0.0226, 50000=0.0224, 150000=0.0214 (USD)", RoHS=Yes, RoHS Compliant=Yes, Series=RT, Stock=10000, Supplier="Future Electronics", Termination=SMD/SMT, Voltage Rating (DC)=50V, Width=0.02inch
R9: library part RT0402BRD0710KL, "RES SMD 10K OHM 0.1% 1/16W 0402", LCSC Part Number=C190095, Manufacturer=Yageo, Supplier Part Number=1236728, Category="Chip SMD Resistors", ComponentLink1Description=https://datasheet.ciiva.com/12836/pyu-rt-1-to-0-05-rohs-l-4-12836454.pdf?src-supplier=Mouser, ComponentLink1URL=https://datasheet.ciiva.com/12836/pyu-rt-1-to-0-05-rohs-l-4-12836454.pdf?src-supplier=Mouser, Item Type=Resistor, Manufacturer Part Number=RT0402BRD0710KL, Pricing="10000=0.0218, 20000=0.0213, 30000=0.021, 50000=0.0206, 100000=0.0199 (USD)", RoHS=Yes, Stock=490000, Supplier="Future Electronics"
R10: library part RC0402FR-071K5L, "RES 1.5K OHM 1% 1/16W 0402", Case Code (Imperial)=0402, Case Code (Metric)=1005, LCSC Part Number=C114759, Manufacturer=Yageo, Max Operating Temperature=155°C, Max Power Dissipation=63mW, Min Operating Temperature=-55°C, Package Quantity=1, Power Rating=62.5mW, Resistance=1.5kR, Resistance Tolerance=1%, Resistor Type="Thick Film", Supplier Part Number 1=311-1.50KLRCT-ND, Temperature Coefficient=100ppm/°C, Voltage Rating=50V, Case/Package=0402, Category="Chip SMD Resistors", ComponentLink1Description=https://datasheet.ciiva.com/11808/0900766b80c66297-11808238.pdf?src-supplier=RSComponents, ComponentLink1URL=https://datasheet.ciiva.com/11808/0900766b80c66297-11808238.pdf?src-supplier=RSComponents, ComponentLink2Description=https://datasheet.ciiva.com/46394/1018594-46394950.pdf?src-supplier=Element14, ComponentLink2URL=https://datasheet.ciiva.com/46394/1018594-46394950.pdf?src-supplier=Element14, ComponentLink3Description=https://datasheet.ciiva.com/2453/pyu-r-int-thick-7-2453440.pdf?src-supplier=Digi-Key, ComponentLink3URL=https://datasheet.ciiva.com/2453/pyu-r-int-thick-7-2453440.pdf?src-supplier=Digi-Key, ComponentLink4Description=https://datasheet.ciiva.com/2453/pyu-r-int-thick-7-2453441.pdf?src-supplier=Digi-Key, ComponentLink4URL=https://datasheet.ciiva.com/2453/pyu-r-int-thick-7-2453441.pdf?src-supplier=Digi-Key, ComponentLink5Description=https://datasheet.ciiva.com/2453/pyu-r-int-thick-7-2453439.pdf?src-supplier=Digi-Key, ComponentLink5URL=https://datasheet.ciiva.com/2453/pyu-r-int-thick-7-2453439.pdf?src-supplier=Digi-Key, ComponentLink6Description=https://datasheet.ciiva.com/12558/pyu-rc0402-51-rohs-l-6-r-8721-12558542.pdf?src-supplier=Mouser, ComponentLink6URL=https://datasheet.ciiva.com/12558/pyu-rc0402-51-rohs-l-6-r-8721-12558542.pdf?src-supplier=Mouser, ComponentLink7Description=https://datasheet.ciiva.com/7849/1018594-7849863.pdf?src-supplier=Element14, ComponentLink7URL=https://datasheet.ciiva.com/7849/1018594-7849863.pdf?src-supplier=Element14, ComponentLink8Description=https://datasheet.ciiva.com/7849/1018594-7849864.pdf?src-supplier=Element14, ComponentLink8URL=https://datasheet.ciiva.com/7849/1018594-7849864.pdf?src-supplier=Element14, ComponentLink9Description=https://datasheet.ciiva.com/15189/getdatasheetpartid-323992-15189370.pdf?src-supplier=Verical, ComponentLink9URL=https://datasheet.ciiva.com/15189/getdatasheetpartid-323992-15189370.pdf?src-supplier=Verical, Construction=Rectangular, Depth=0.5mm, Features="Moisture Resistant", Height=0.016inch, Lead Free="Lead Free", Length=1mm, Manufacturer Part Number=RC0402FR-071K5L, Military Standard=Not, Number of Terminations=2, Packaging="Tape and Reel", Pricing 1="1=0.10000, 10=0.01500, 100=0.00610, 1000=0.00275, 2500=0.00239, 5000=0.00197 (USD)", REACH SVHC="No SVHC", RoHS=Yes, RoHS Compliant=Yes, Series=RC, Size Code=0402, Stock 1=2832947, Supplier 1=Digi-Key, Technology="THICK FILM", Termination=SMD/SMT, Tolerance=1%, Width=0.02inch
R11 R38 R39 R40 R41: library part RC0402FR-071KL, "RES 1K OHM 1% 1/16W 0402", Case Code (Imperial)=0402, Case Code (Metric)=1005, LCSC Part Number=C106235, Manufacturer=Yageo, Max Operating Temperature=155°C, Max Power Dissipation=63mW, Min Operating Temperature=-55°C, Power Rating=62.5mW, Resistance=1kR, Resistance Tolerance=1%, Resistor Type="Thick Film", Temperature Coefficient=100ppm/°C, Voltage Rating=50V, Case/Package=0402, Category="Chip SMD Resistors", ComponentLink1Description=https://datasheet.ciiva.com/11819/0900766b80c66297-11819477.pdf?src-supplier=RSComponents, ComponentLink1URL=https://datasheet.ciiva.com/11819/0900766b80c66297-11819477.pdf?src-supplier=RSComponents, ComponentLink2Description=https://datasheet.ciiva.com/7983/1018594-7983502.pdf?src-supplier=Element14, ComponentLink2URL=https://datasheet.ciiva.com/7983/1018594-7983502.pdf?src-supplier=Element14, ComponentLink3Description=https://datasheet.ciiva.com/22747/1018594-22747513.pdf?src-supplier=Element14, ComponentLink3URL=https://datasheet.ciiva.com/22747/1018594-22747513.pdf?src-supplier=Element14, ComponentLink4Description=https://datasheet.ciiva.com/12666/pyu-rc0402-51-rohs-l-6-r-12666741.pdf?src-supplier=Mouser, ComponentLink4URL=https://datasheet.ciiva.com/12666/pyu-rc0402-51-rohs-l-6-r-12666741.pdf?src-supplier=Mouser, ComponentLink5Description=https://datasheet.ciiva.com/7849/1018594-7849869.pdf?src-supplier=Element14, ComponentLink5URL=https://datasheet.ciiva.com/7849/1018594-7849869.pdf?src-supplier=Element14, ComponentLink6Description=https://datasheet.ciiva.com/7849/1018594-7849871.pdf?src-supplier=Element14, ComponentLink6URL=https://datasheet.ciiva.com/7849/1018594-7849871.pdf?src-supplier=Element14, ComponentLink7Description=https://datasheet.ciiva.com/17063/pyu-rc0402-51-rohs-l-6-r-17063193.pdf?src-supplier=Future+Electronics, ComponentLink7URL=https://datasheet.ciiva.com/17063/pyu-rc0402-51-rohs-l-6-r-17063193.pdf?src-supplier=Future+Electronics, Construction=Rectangular, Depth=0.5mm, Features="Moisture Resistant", Height=0.32mm, Item Type=Resistor, Lead Free="Lead Free", Length=1mm, Manufacturer Part Number=RC0402FR-071KL, Military Standard=Not, Number of Pins=2, Number of Terminations=2, Packaging="Tape and Reel", Pricing 1="10000=0.00085, 20000=0.00087, 40000=0.00084, 60000=0.00083, 80000=0.00079, 100000=0.00078, 1000000=0.00076 (USD)", Reach SVHC Compliant=Yes, RoHS=Yes, RoHS Compliant=Yes, Series=RC, Size Code=0402, Stock 1=13030000, Supplier 1=Avnet, Supplier Part Number 1=RC0402FR-071KL, Technology="THICK FILM", Termination=SMD/SMT, Tolerance=1%, Voltage Rating (DC)=50V, Width=0.5mm
R12: library part RC0402FR-07100KL, "RES 100K OHM 1% 1/16W 0402", Case Code (Imperial)=0402, Case Code (Metric)=1005, LCSC Part Number=C60491, Manufacturer=Yageo, Max Operating Temperature=155°C, Max Power Dissipation=63mW, Min Operating Temperature=-55°C, Package Quantity=1, Resistance=100kR, Resistance Tolerance=1%, Resistor Type="Thick Film", Supplier Part Number 1=603-RC0402FR-07100KL, Temperature Coefficient=100ppm/°C, Voltage Rating=50V, Case/Package=0402, Category="Chip SMD Resistors", ComponentLink1Description=https://datasheet.ciiva.com/11819/0900766b80c66297-11819452.pdf?src-supplier=RSComponents, ComponentLink1URL=https://datasheet.ciiva.com/11819/0900766b80c66297-11819452.pdf?src-supplier=RSComponents, ComponentLink2Description=https://datasheet.ciiva.com/22747/1018594-22747509.pdf?src-supplier=Element14, ComponentLink2URL=https://datasheet.ciiva.com/22747/1018594-22747509.pdf?src-supplier=Element14, ComponentLink3Description=https://datasheet.ciiva.com/2453/pyu-r-int-thick-7-2453362.pdf?src-supplier=Digi-Key, ComponentLink3URL=https://datasheet.ciiva.com/2453/pyu-r-int-thick-7-2453362.pdf?src-supplier=Digi-Key, ComponentLink4Description=https://datasheet.ciiva.com/2453/pyu-r-int-thick-7-2453363.pdf?src-supplier=Digi-Key, ComponentLink4URL=https://datasheet.ciiva.com/2453/pyu-r-int-thick-7-2453363.pdf?src-supplier=Digi-Key, ComponentLink5Description=https://datasheet.ciiva.com/2453/pyu-r-int-thick-7-2453361.pdf?src-supplier=Digi-Key, ComponentLink5URL=https://datasheet.ciiva.com/2453/pyu-r-int-thick-7-2453361.pdf?src-supplier=Digi-Key, ComponentLink6Description=https://datasheet.ciiva.com/12667/pyu-rc0402-51-rohs-l-6-r-12667930.pdf?src-supplier=Mouser, ComponentLink6URL=https://datasheet.ciiva.com/12667/pyu-rc0402-51-rohs-l-6-r-12667930.pdf?src-supplier=Mouser, ComponentLink7Description=https://datasheet.ciiva.com/15189/getdatasheetpartid-323696-15189334.pdf?src-supplier=Verical, ComponentLink7URL=https://datasheet.ciiva.com/15189/getdatasheetpartid-323696-15189334.pdf?src-supplier=Verical, Construction=Rectangular, Depth=0.5mm, Features="Moisture Resistant", Height=0.016inch, Item Type=Resistor, Lead Free="Lead Free", Length=0.039inch, Manufacturer Part Number=RC0402FR-07100KL, Military Standard=Not, Number of Terminations=2, Packaging="Tape and Reel", Power Rating=63mW, Pricing 1="1=0.10000, 10=0.01200, 50=0.01200, 100=0.00500, 1000=0.00300, 2500=0.00200, 10000=0.00100 (USD)", REACH SVHC="No SVHC", RoHS=Yes, RoHS Compliant=Yes, Series=RC, Stock 1=7759549, Supplier 1=Mouser, Technology="THICK FILM", Termination=SMD/SMT, Tolerance=1%, Width=0.02inch, Working Voltage=50V
R13: library part RC0402FR-07499RL, "RES 499 OHM 1% 1/16W 0402", Case Code (Imperial)=0402, Case Code (Metric)=1005, LCSC Part Number=C137970, Manufacturer=Yageo, Max Operating Temperature=155°C, Max Power Dissipation=63mW, Min Operating Temperature=-55°C, Package Quantity=1, Power Rating=62.5mW, Resistance Tolerance=1%, Resistor Type="Thick Film", Supplier Part Number 1=603-RC0402FR-07499RL, Temperature Coefficient=100ppm/°C, Voltage Rating=50V, Case/Package=0402, Category="Chip SMD Resistors", ComponentLink1Description=https://datasheet.ciiva.com/2453/pyu-r-int-thick-7-2453539.pdf?src-supplier=Digi-Key, ComponentLink1URL=https://datasheet.ciiva.com/2453/pyu-r-int-thick-7-2453539.pdf?src-supplier=Digi-Key, ComponentLink2Description=https://datasheet.ciiva.com/2453/pyu-r-int-thick-7-2453540.pdf?src-supplier=Digi-Key, ComponentLink2URL=https://datasheet.ciiva.com/2453/pyu-r-int-thick-7-2453540.pdf?src-supplier=Digi-Key, ComponentLink3Description=https://datasheet.ciiva.com/2453/pyu-r-int-thick-7-2453538.pdf?src-supplier=Digi-Key, ComponentLink3URL=https://datasheet.ciiva.com/2453/pyu-r-int-thick-7-2453538.pdf?src-supplier=Digi-Key, Construction=Rectangular, Depth=0.5mm, Features="Moisture Resistant", Height=0.016inch, Lead Free="Lead Free", Length=1mm, Manufacturer Part Number=RC0402FR-07499RL, Military Standard=Not, Number of Terminations=2, Packaging="Tape and Reel", Pricing 1="1=0.10000, 10=0.01200, 50=0.01200, 100=0.00500, 1000=0.00300, 10000=0.00100 (USD)", REACH SVHC="No SVHC", Resistance=499R, RoHS=Yes, RoHS Compliant=Yes, Series=RC, Size Code=0402, Stock 1=936879, Supplier 1=Mouser, Termination=SMD/SMT, Tolerance=1%, Voltage Rating (DC)=50V, Width=0.02inch